# Altium PCB PCB1.PcbDoc
Units mm, origin at the board's own origin, x right, y up, seen from the top; angles counter-clockwise.
Board outline 89 x 51 mm, 4 copper layers (Top Layer 1, GND, Main Power, Small Signal), stack 0.603 mm thick; 88 components, 55 nets, 271 pads, 336 vias.
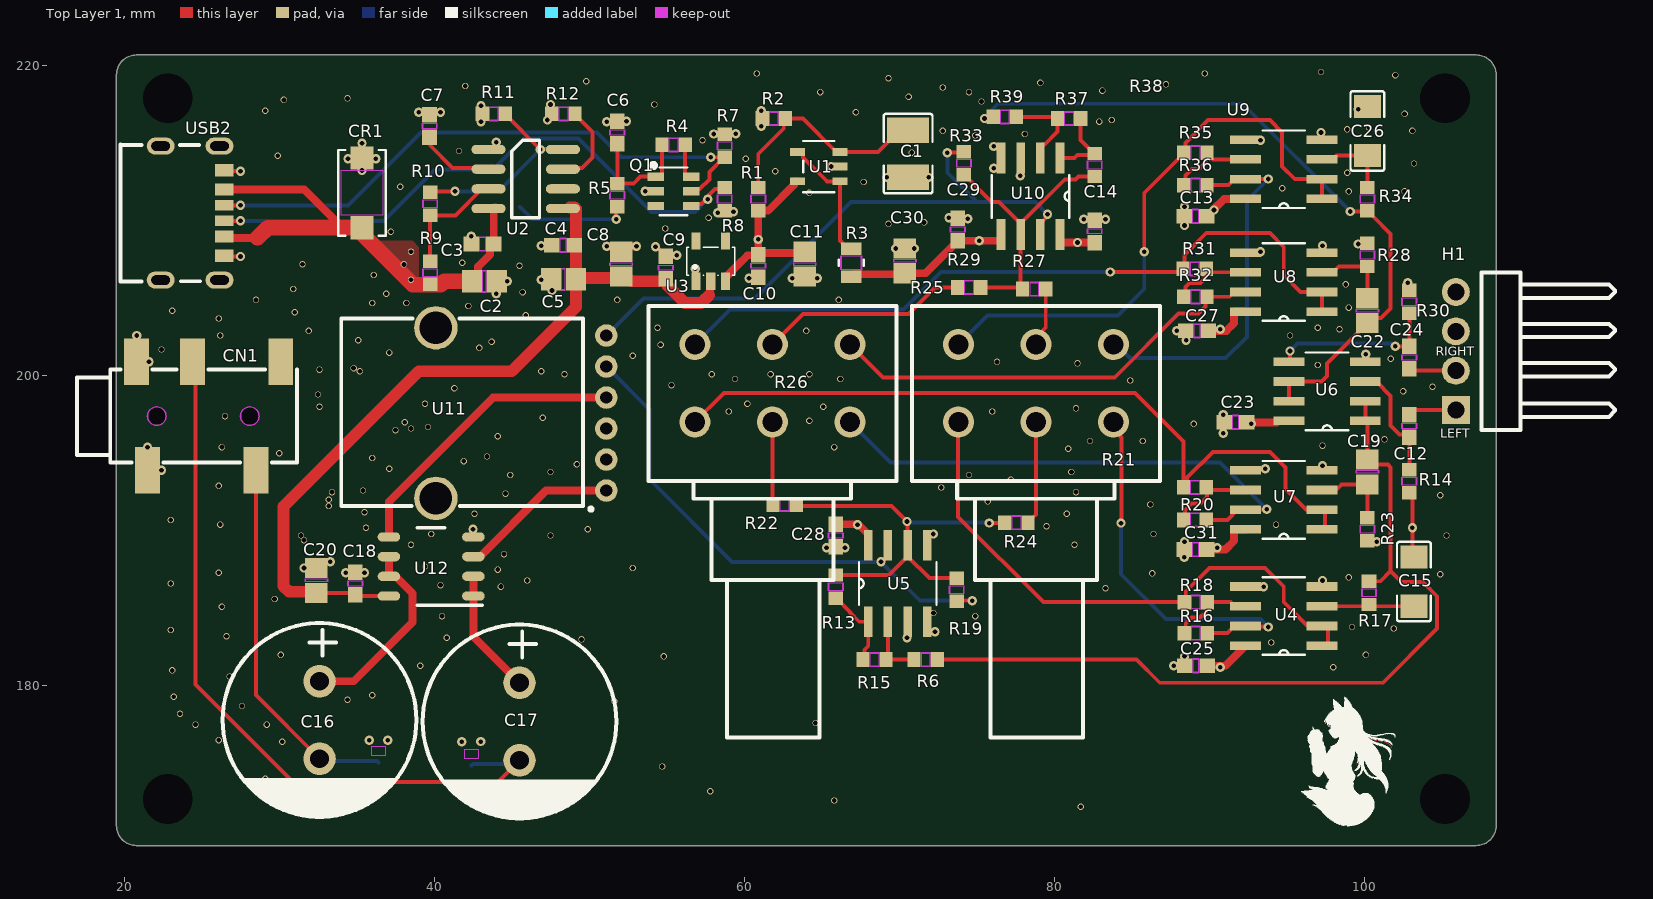
[diagram p0: Top Layer 1 view]
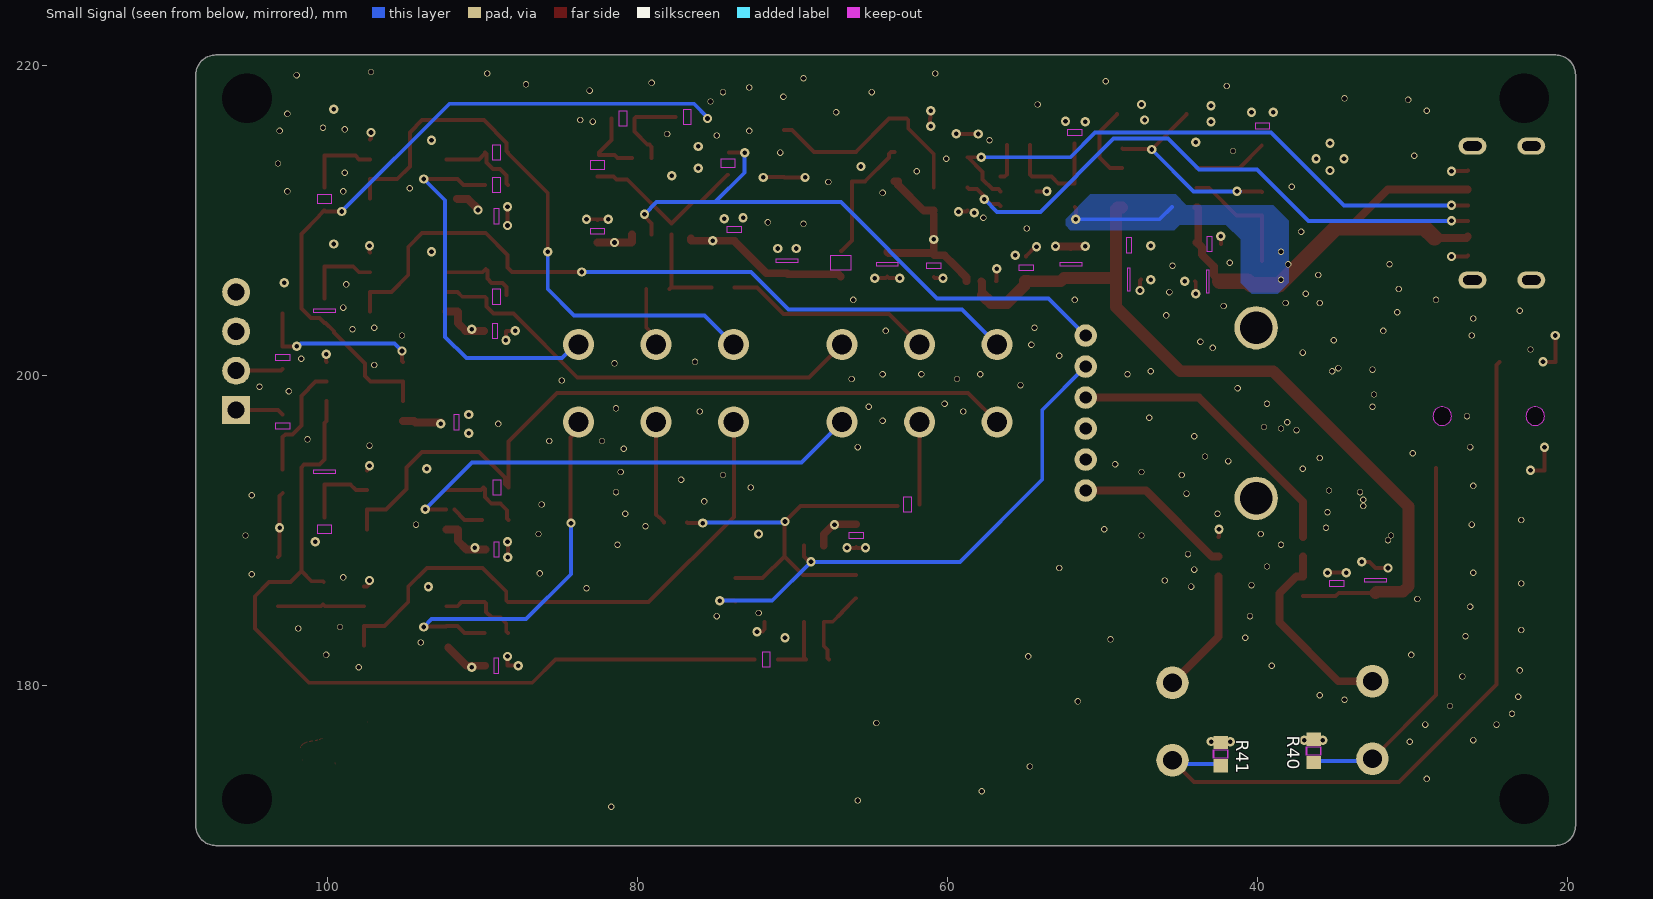
[diagram p1: Small Signal view, seen from below]
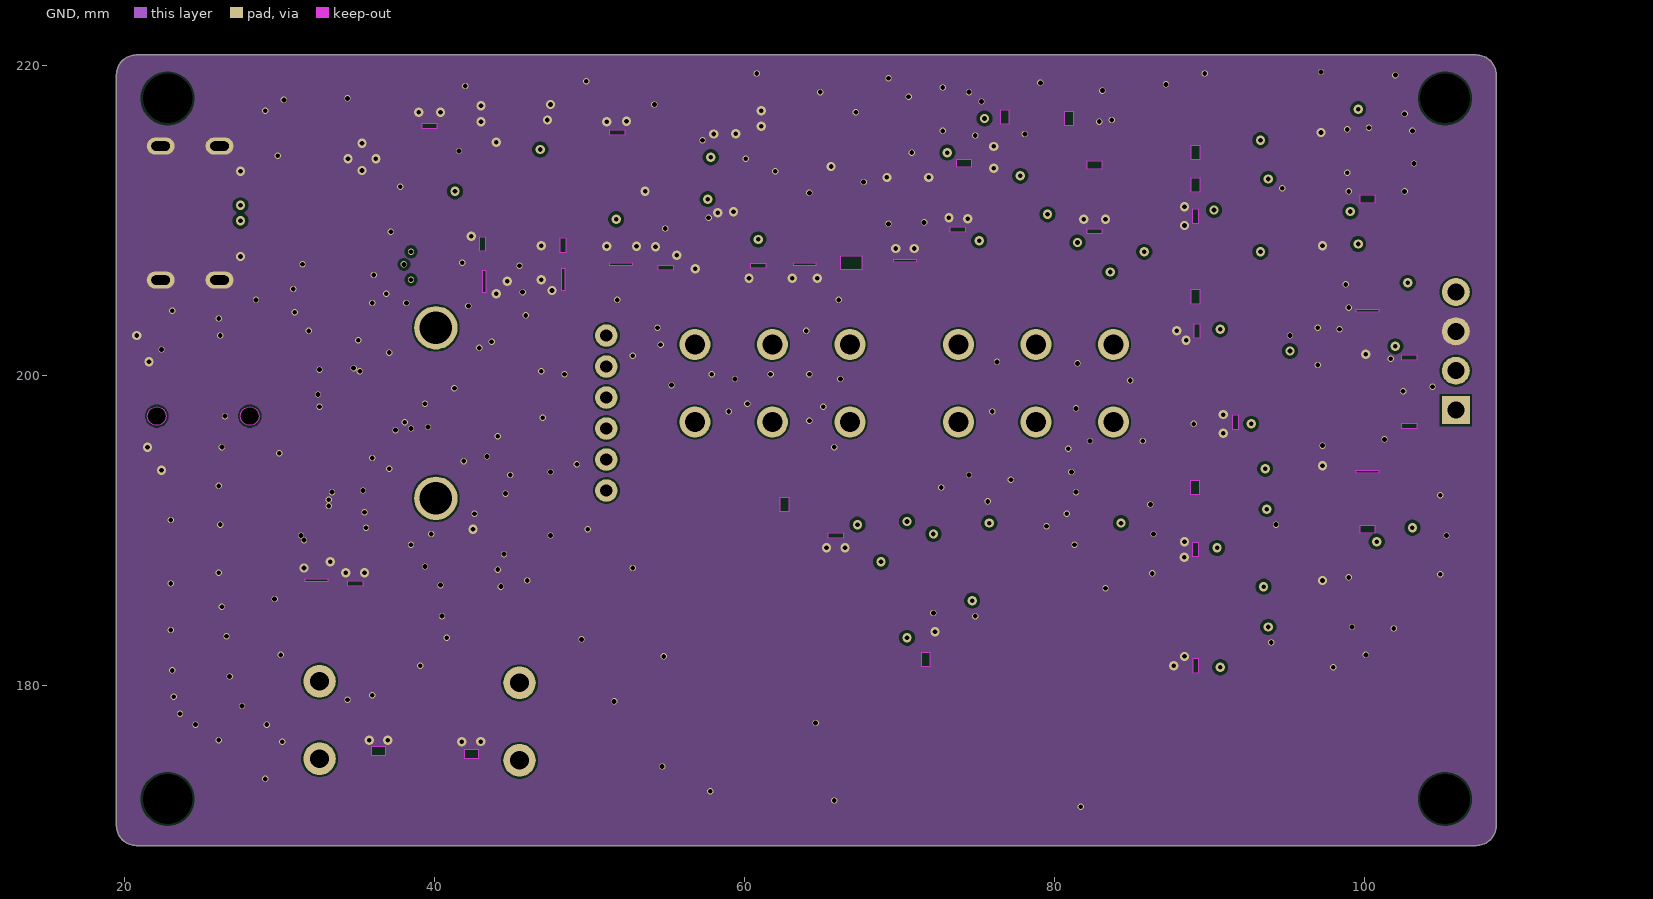
[diagram p2: GND]
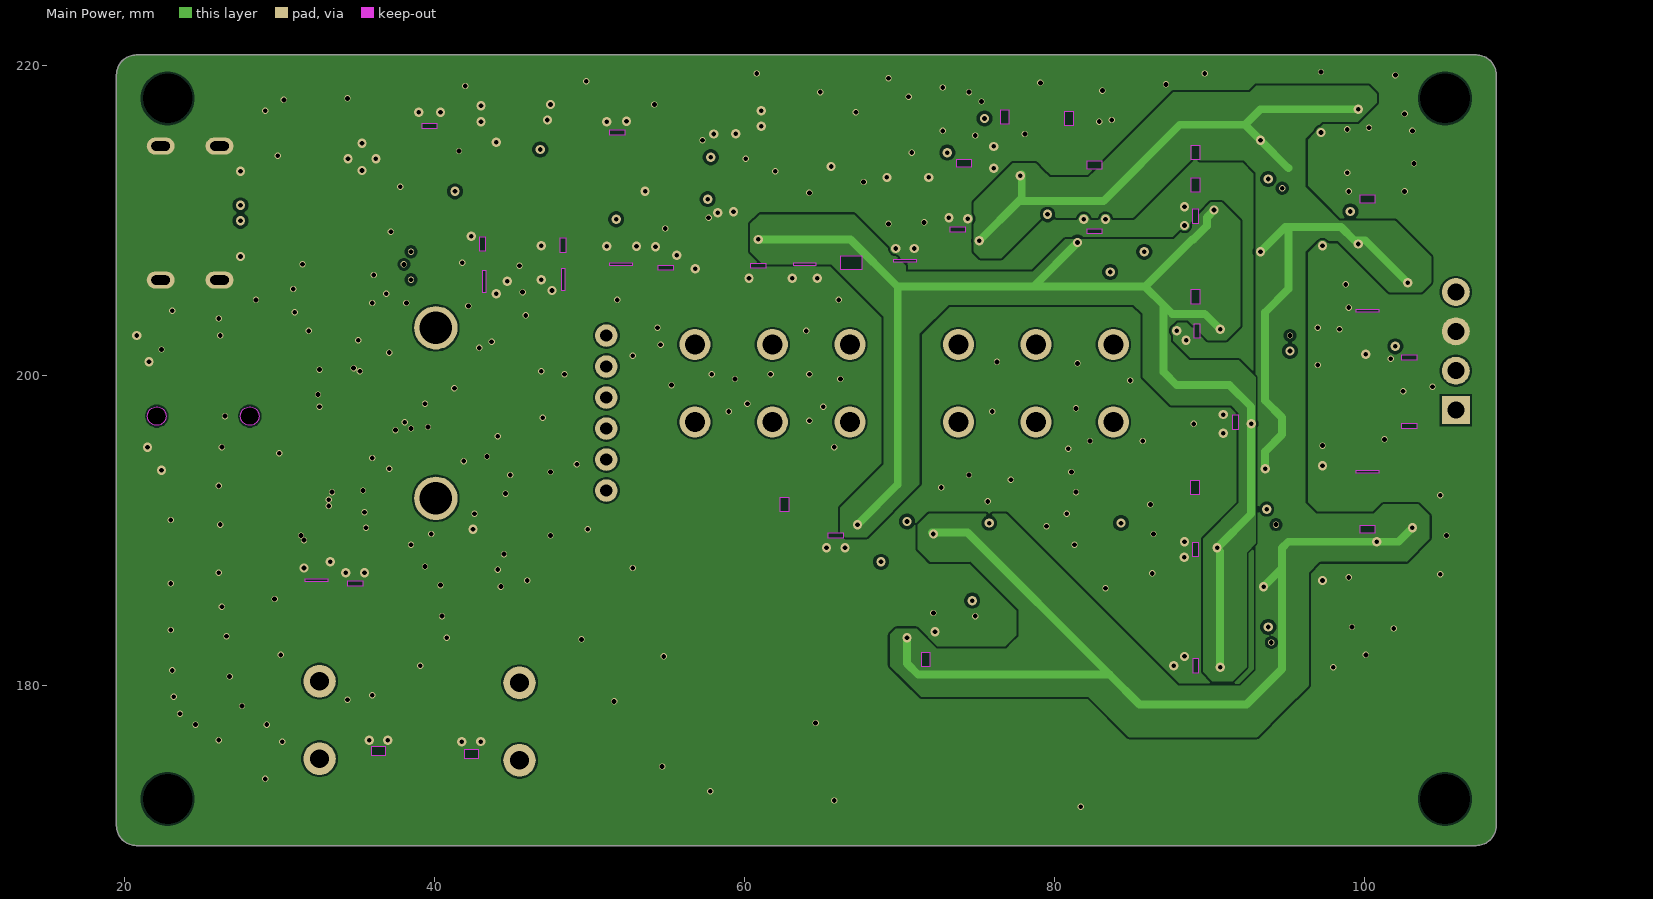
[diagram p3: Main Power]
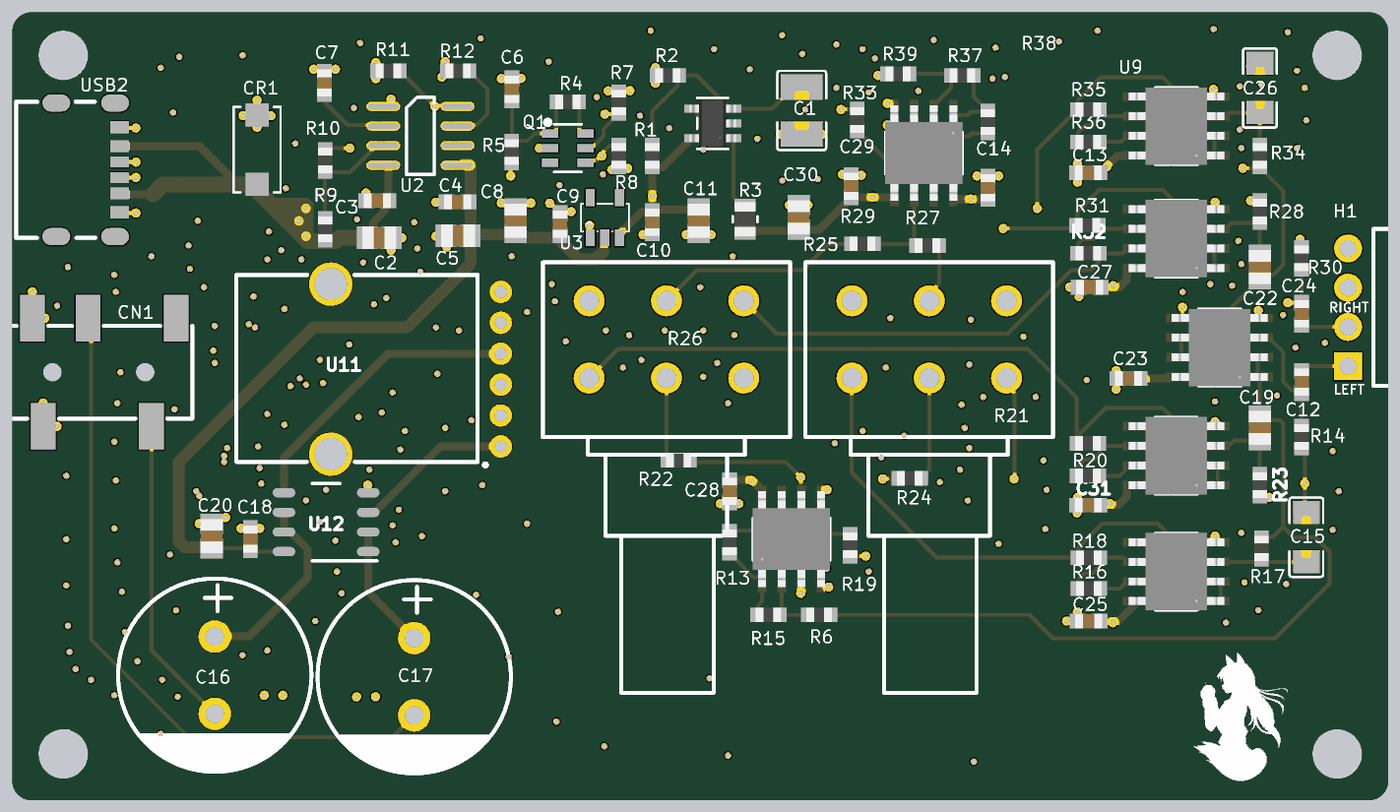
[diagram p4: 3D render of the assembled board from above, using the file's embedded part models]

## Layer stack, top to bottom
Top Solder: solder mask 0.0102, Solder Resist, Dk 3.5
Top Layer 1: signal copper 0.035
Dielectric 2: prepreg 0.0711, PP-006, Dk 4.1
GND: signal copper 0.0356
Dielectric 1: dielectric 0.32, FR-4, Dk 4.8
Main Power: signal copper 0.0356
Dielectric 3: prepreg 0.0711, PP-006, Dk 4.1
Small Signal: signal copper 0.035
Bottom Solder: solder mask 0.0102, Solder Resist, Dk 3.5

## Board outline
19.5,170.97 19.5,219.43 cw(c20.77,219.43) 20.77,220.7 107.23,220.7 cw(c107.23,219.43) 108.5,219.43 108.5,170.97 cw(c107.23,170.97) 107.23,169.7 20.77,169.7 cw(c20.77,170.97)

## Design rules (kind name [scope] priority, off if disabled: settings)
Clearance Clearance_Keepout [IsKeepOut] p1: gap=0 ignorepadtopadclearanceinfootprint=FALSE
Clearance [All] p2: gap=0.127 ignorepadtopadclearanceinfootprint=FALSE except(0.203: Arc-Via Track-Via SMDPad-Via THPad-Via Via-Via Via-Fill Via-Poly Via-Region Via-Text Via-Hole)
ComponentClearance [All] p1: gap=-1 collisioncheckmode=3 verticalgap=-1 showdistances=FALSE
HoleToHoleClearance [All] p1: gap=-1 allowstackedmicrovias=TRUE
MinimumSolderMaskSliver [All] p1: minsoldermaskwidth=-1
PlaneConnect [All] p1: planeconnectstyle=Direct reliefexpansion=0.508 reliefentries=4 reliefconductorwidth=0.254 reliefairgap=0.254
PolygonConnect [All] p1: connectstyle=Direct reliefconductorwidth=0.254 reliefentries=4 polygonreliefangle="90 Angle" airgapwidth=0.254
RoutingVias [All] p1: holewidth=0.3 width=0.6 viastyle="Through Hole" minholewidth=0.2 minwidth=0.5 maxholewidth=0.4 maxwidth=0.8
SilkToSilkClearance [All] p1: silktosilkclearance=-1
SilkToSolderMaskClearance [IsPad] p1: minsilkscreentomaskgap=-1 clearancetoexposedcopper=TRUE
SolderMaskExpansion [All] p1: expansion=0.102 istentingtop=FALSE
SupplyNets "Schematic Supply Nets_5" [InNet('Vref')] p1: voltage=0.000
SupplyNets "Schematic Supply Nets_3" [InNet('+15V_PROTECTED')] p2: voltage=0.000
SupplyNets "Schematic Supply Nets_2" [InNet('+12V')] p3: voltage=0.000
SupplyNets "Schematic Supply Nets_1" [InNet('GND')] p4: voltage=0.000
Width [All] p1: maxlimit=1816.048 minlimit=0.102 preferedwidth=0.254 toplayer_maxwidth=1816.048 midlayer1_minwidth=0.102 midlayer2_minwidth=0.102 bottomlayer_minwidth=0.102 minimp=50.000000 maximp=50.000000 favimp=50.000000
24 further rules are at their usual default settings.

## Classes and differential pairs
component class U_OUTPUT: C18 C20 U11 U12
component class U_Vref: C1 C29 C30 R1 R2 R3 U1
component class U_Power: C2 C3 C4 C5 C6 C7 C8 C9 C10 C11 CR1 Q1 R4 R5 R7 R8 R9 R10 R11 R12 U2 U3 USB2
component class U_BASSTreble: C12 C13 C14 C15 C19 C22 C23 C24 C25 C26 C27 C28 C31 R6 R13 R14 R15 R16 R17 R18 R19 R20 R21 R22 R23 R24 R25 R26 R27 R28 R29 R30 R31 R32 R33 R34 R35 R36 R37 R38 R39 U4 U5 U6 U7 U8 U9 U10
component class TOP: C16 C17 CN1 H1 R40 R41

## Components (designator, comment, footprint, x,y, rotation, side; value= is the part's Value field where it differs from the comment)
C1 "rk12l12c0a0e" "1210 CAP" 70.564,214.335 r90 top
C2 "rk12l12c0a0e" "0805 CAP - C0G" 43.236,206.1 r0 top
C3 "rk12l12c0a0e" "0603 Cap - C0G" 43.111,208.5 r180 top
C4 "rk12l12c0a0e" "0603 Cap - C0G" 48.31,208.424 r180 top
C5 "rk12l12c0a0e" "0805 CAP - C0G" 48.335,206.224 r180 top
C6 "rk12l12c0a0e" "0603 Cap - C0G" 51.811,215.7 r270 top
C7 "rk12l12c0a0e" "0603 Cap - C0G" 39.7,216.125 r270 top
C8 "rk12l12c0a0e" "0805 CAP - C0G" 52.061,207.2 r270 top
C9 "rk12l12c0a0e" "0603 Cap - C0G" 54.936,206.975 r270 top
C10 "rk12l12c0a0e" "0603 Cap - C0G" 60.9,207.1 r90 top
C11 "rk12l12c0a0e" "0805 CAP - C0G" 63.9,207.2 r90 top
C12 "rk12l12c0a0e" "0603 Cap - C0G" 102.9,196.774 r270 top
C13 "rk12l12c0a0e" "0603 Cap - C0G" 89.1,210.3 r180 top
C14 "rk12l12c0a0e" "0603 Cap - C0G" 82.6,209.325 r90 top
C15 "rk12l12c0a0e" "1206 CAP C0G" 103.2,186.728 r270 top
C16 "rk12l12c0a0e" "ELC CAP D=5" 32.6,177.8 r270 top value=2200uF
C17 "rk12l12c0a0e" "ELC CAP D=5" 45.5,177.7 r270 top value=2200uF
C18 "rk12l12c0a0e" "0603 Cap - C0G" 34.9,186.6 r270 top
C19 "rk12l12c0a0e" "0805 CAP - C0G" 100.2,193.8 r270 top
C20 "rk12l12c0a0e" "0805 CAP - C0G" 32.4,186.8 r270 top
C22 "rk12l12c0a0e" "0805 CAP - C0G" 100.2,204.2 r90 top
C23 "rk12l12c0a0e" "0603 Cap - C0G" 91.7,197 r180 top
C24 "rk12l12c0a0e" "0603 Cap - C0G" 102.9,201.174 r90 top
C25 "rk12l12c0a0e" "0603 Cap - C0G" 89.126,181.3 r0 top
C26 "rk12l12c0a0e" "1206 CAP C0G" 100.2,215.793 r90 top
C27 "rk12l12c0a0e" "0603 Cap - C0G" 89.2,202.9 r0 top
C28 "rk12l12c0a0e" "0603 Cap - C0G" 65.9,189.7 r90 top
C29 "rk12l12c0a0e" "0603 Cap - C0G" 73.764,209.443 r90 top
C30 "rk12l12c0a0e" "0805 CAP - C0G" 70.364,207.418 r270 top
C31 "rk12l12c0a0e" "0603 Cap - C0G" 89.1,188.8 r180 top
CN1 "rk12l12c0a0e" "3.5mm 5pin SMD" 25.45,197.4 r0 top
CR1 "rk12l12c0a0e" "TVS diode" 35.336,211.8 r90 top
H1 "rk12l12c0a0e" "4pin connector" 105.9,201.6 r90 top
Q1 "rk12l12c0a0e" CH221K 55.436,211.9 r270 top
R1 "rk12l12c0a0e" "0603 RES"#1 60.9,211.4 r90 top
R2 "rk12l12c0a0e" "0603 RES"#1 61.9,216.6 r180 top
R3 "rk12l12c0a0e" "0805 RES" 66.9,207.3 r90 top
R4 "rk12l12c0a0e" "0603 RES"#1 55.436,214.9 r180 top
R5 "rk12l12c0a0e" "0603 RES"#1 51.806,211.646 r90 top
R6 "rk12l12c0a0e" "0603 RES"#2 71.7,181.7 r0 top
R7 "rk12l12c0a0e" "0603 RES"#1 58.736,214.846 r270 top
R8 "rk12l12c0a0e" "0603 RES"#1 58.736,211.4 r90 top
R9 "rk12l12c0a0e" "0603 RES"#1 39.736,206.646 r90 top
R10 "rk12l12c0a0e" "0603 RES"#1 39.736,211.098 r90 top
R11 "rk12l12c0a0e" "0603 RES"#1 43.836,216.9 r180 top
R12 "rk12l12c0a0e" "0603 RES"#1 48.336,216.9 r180 top
R13 "rk12l12c0a0e" "0603 RES"#1 65.9,186.4 r270 top
R14 "rk12l12c0a0e" "0603 RES"#1 102.895,193.2 r90 top
R15 "rk12l12c0a0e" "0603 RES"#1 68.4,181.7 r180 top
R16 "rk12l12c0a0e" "0603 RES"#1 89.126,183.4 r180 top
R17 "rk12l12c0a0e" "0603 RES"#1 100.3,186 r270 top
R18 "rk12l12c0a0e" "0603 RES"#1 89.126,185.4 r180 top
R19 "rk12l12c0a0e" "0603 RES"#1 73.7,186.2 r90 top
R20 "rk12l12c0a0e" "0603 RES"#1 89.074,190.7 r180 top
R21 "rk12l12c0a0e" "0603 RES"#2 89.074,192.8 r180 top
R22 "rk12l12c0a0e" "0603 RES"#2 62.6,191.7 r0 top
R23 "rk12l12c0a0e" "0603 RES"#2 100.2,190.1 r90 top
R24 "rk12l12c0a0e" "0603 RES"#1 77.553,190.535 r180 top
R25 "rk12l12c0a0e" "Potentiometers 10K RK16312101A2" 78.5,198.8 r270 top value=10kΩ
R26 "rk12l12c0a0e" "Potentiometers 10K RK16312101A2" 61.5,198.8 r270 top value=10kΩ
R27 "rk12l12c0a0e" "0603 RES"#1 78.7,205.6 r180 top
R28 "rk12l12c0a0e" "0603 RES"#1 100.2,207.8 r270 top
R29 "rk12l12c0a0e" "0603 RES"#1 74.5,205.7 r0 top
R30 "rk12l12c0a0e" "0603 RES"#1 102.895,204.774 r270 top
R31 "rk12l12c0a0e" "0603 RES"#1 89.053,206.9 r180 top
R32 "rk12l12c0a0e" "0603 RES"#2 89.1,205.1 r180 top
R33 "rk12l12c0a0e" "0603 RES"#2 74.164,213.718 r270 top
R34 "rk12l12c0a0e" "0603 RES"#2 100.2,211.4 r90 top
R35 "rk12l12c0a0e" "0603 RES"#2 89.1,214.4 r180 top
R36 "rk12l12c0a0e" "0603 RES"#2 89.1,212.3 r180 top
R37 "rk12l12c0a0e" "0603 RES"#2 80.954,216.6 r0 top
R38 "rk12l12c0a0e" "0603 RES"#2 82.6,213.6 r90 top
R39 "rk12l12c0a0e" "0603 RES"#2 76.8,216.7 r180 top
R40 "rk12l12c0a0e" "0603 RES"#2 36.4,175.8 r270 bottom
R41 "rk12l12c0a0e" "0603 RES"#2 42.4,175.6 r90 bottom
U1 "rk12l12c0a0e" OPA197IDBVR 64.8,213.5 r180 top
U2 "rk12l12c0a0e" "TPS25921ADR e-fuse" 45.9,212.695 r0 top
U3 "rk12l12c0a0e" LDO 57.836,207.4 r270 top
U4 "rk12l12c0a0e" OPA1612AIDR 94.8,184.5 r180 top
U5 "rk12l12c0a0e" OPA1612AIDR 69.9,186.6 r90 top
U6 "rk12l12c0a0e" OPA1612AIDR 97.6,199 r180 top
U7 "rk12l12c0a0e" OPA1612AIDR 94.8,192 r180 top
U8 "rk12l12c0a0e" OPA1612AIDR 94.8,206.045 r180 top
U9 "rk12l12c0a0e" OPA1612AIDR 94.8,213.326 r180 top
U10 "rk12l12c0a0e" OPA1612AIDR 78.464,211.581 r270 top
U11 "rk12l12c0a0e" "LOG Potentiometer" 45.6,197.6 r90 top value=10kΩ
U12 "rk12l12c0a0e" OPA1656IDR 39.8,187.7 r180 top
USB2 "rk12l12c0a0e" USB-C-SMD_10P-P1.00-L6.8-W8.9 24.4,210.5 r270 top

## Footprints (in the part's own frame and the unit in brackets; to place one, negate y for a bottom-side part, rotate by r counter-clockwise, add the part's x,y. Pads: shape width x height; smd on the part's side, far side on the other; paste and mask are expansions set on the pad)
"3.5mm 5pin SMD" [mm]
  rect 1.6x3 smd: 2(-4.65,3.5) 3(4.65,3.5) 4(3.05,-3.5) 5(-3.95,-3.5) 6(-1.05,3.5)
  Top Layer 1 keep-out circle w0.003: c2.65,0 r0.6
  Top Layer 1 keep-out circle w0.003: c-3.35,0 r0.6
  Top Layer 1 keep-out region: 3.25,0 3.191,-0.26 3.024,-0.469 2.783,-0.585 2.516,-0.585 2.276,-0.469 2.109,-0.26 2.05,0 2.05,0 2.109,0.26 2.276,0.469 2.516,0.585 2.783,0.585 3.024,0.469 3.191,0.26 3.25,0
  Top Layer 1 keep-out region: -2.75,0 -2.809,-0.26 -2.976,-0.469 -3.216,-0.585 -3.484,-0.585 -3.724,-0.469 -3.891,-0.26 -3.95,0 -3.95,0 -3.891,0.26 -3.724,0.469 -3.484,0.585 -3.216,0.585 -2.976,0.469 -2.809,0.26 -2.75,0
  Top Layer 1 keep-out region: 3.25,0 3.241,-0.104 3.214,-0.205 3.17,-0.3 3.11,-0.386 3.036,-0.46 2.95,-0.52 2.855,-0.564 2.754,-0.591 2.65,-0.6 2.546,-0.591 2.445,-0.564 2.35,-0.52 2.264,-0.46 2.19,-0.386 2.13,-0.3 2.086,-0.205 2.059,-0.104 2.05,0 2.059,0.104 2.086,0.205 2.13,0.3 2.19,0.386 2.264,0.46 2.35,0.52 2.445,0.564 2.546,0.591 2.65,0.6 2.754,0.591 2.855,0.564 2.95,0.52 3.036,0.46 3.11,0.386 3.17,0.3 3.214,0.205 3.241,0.104 3.25,0
  Top Layer 1 keep-out region: -2.75,0 -2.759,-0.104 -2.786,-0.205 -2.83,-0.3 -2.89,-0.386 -2.964,-0.46 -3.05,-0.52 -3.145,-0.564 -3.246,-0.591 -3.35,-0.6 -3.454,-0.591 -3.555,-0.564 -3.65,-0.52 -3.736,-0.46 -3.81,-0.386 -3.87,-0.3 -3.914,-0.205 -3.941,-0.104 -3.95,0 -3.941,0.104 -3.914,0.205 -3.87,0.3 -3.81,0.386 -3.736,0.46 -3.65,0.52 -3.555,0.564 -3.454,0.591 -3.35,0.6 -3.246,0.591 -3.145,0.564 -3.05,0.52 -2.964,0.46 -2.89,0.386 -2.83,0.3 -2.786,0.205 -2.759,0.104 -2.75,0
  Keep-Out Layer board cut-out: 3.25,0 3.191,-0.26 3.024,-0.469 2.783,-0.585 2.516,-0.585 2.276,-0.469 2.109,-0.26 2.05,0 2.05,0 2.109,0.26 2.276,0.469 2.516,0.585 2.783,0.585 3.024,0.469 3.191,0.26 3.25,0
  Keep-Out Layer board cut-out: -2.75,0 -2.809,-0.26 -2.976,-0.469 -3.216,-0.585 -3.484,-0.585 -3.724,-0.469 -3.891,-0.26 -3.95,0 -3.95,0 -3.891,0.26 -3.724,0.469 -3.484,0.585 -3.216,0.585 -2.976,0.469 -2.809,0.26 -2.75,0
  silkscreen extent -8.5,-3 5.7,3
"4pin connector" [mm]
  rect 1.8x1.8 hole 1.1: 1(-3.81,0)
  round 1.8 hole 1.1: 2(-1.27,0) 3(1.27,0) 4(3.81,0)
  silkscreen extent -5.09,-10.27 5.07,-1.65
"0603 Cap - C0G" [mm]
  rect 1x0.95 smd paste+0 mask+0: 1(-0.725,0) 2(0.725,0)
  Top Layer 1 keep-out region: -0.174,-0.424 -0.174,0.424 0.174,0.424 0.174,-0.424
  Keep-Out Layer region: -0.174,-0.475 -0.174,0.475 0.174,0.475 0.174,-0.475
  body extent -0.87,-0.48 0.87,0.48, height 0.95
"0603 RES"#1 [mil]
  rect 33.78x37 smd paste+0 mask+0: 1(-29.39,0) 2(29.39,0)
  Top Layer 1 keep-out region: -10.5,-16.5 -10.5,16.5 10.5,16.5 10.5,-16.5
  Top Layer 1 keep-out region: -10.5,-18.5 -10.5,18.5 10.5,18.5 10.5,-18.5
  body extent -33,-19 33,19, height 20
"0603 RES"#2 [mil]
  rect 33.78x37 smd paste+0 mask+0: 1(-29.39,0) 2(29.39,0)
  Top Layer 1 keep-out region: -10.5,-16.5 -10.5,16.5 10.5,16.5 10.5,-16.5
  Keep-Out Layer region: -10.5,-18.5 -10.5,18.5 10.5,18.5 10.5,-18.5
  body extent -33,-19 33,19, height 20
"0805 CAP - C0G" [mm]
  rect 1.3x1.45 smd paste+0 mask+0: 1(-0.8,0) 2(0.8,0)
  Top Layer 1 keep-out region: -0.099,-0.674 -0.099,0.674 0.099,0.674 0.099,-0.674
  Keep-Out Layer region: -0.099,-0.725 -0.099,0.725 0.099,0.725 0.099,-0.725
  body extent -1.1,-0.72 1.1,0.72, height 0.88
"0805 RES" [mil]
  rect 32x53 smd paste+0 mask+0: 1(-35.5,0) 2(35.5,0)
  Top Layer 1 keep-out region: -17.5,-24.5 -17.5,24.5 17.5,24.5 17.5,-24.5
  Keep-Out Layer region: -17.5,-26.5 -17.5,26.5 17.5,26.5 17.5,-26.5
  silkscreen extent -7,-32 7,32, body extent -44,-26 44,26, height 26
"1206 CAP C0G" [mm]
  rect 1.485x1.728 smd paste-100 mask+0.051: 1(-1.593,0) 2(1.593,0)
  silkscreen extent -2.56,-1.09 2.56,1.09
"1210 CAP" [mm]
  rect 1.635x2.7 smd paste-100 mask+0.051: 1(-1.517,0) 2(1.517,0)
  silkscreen extent -2.56,-1.58 2.56,1.58
CH221K [mm] "SOT-23-6_L2.9-W1.6-P0.95-LS2.8-BL-2"
  rect 0.532x1.072 smd: 1(-0.95,-1.149) 2(0,-1.149) 3(0.95,-1.149) 4(0.95,1.149) 5(0,1.149) 6(-0.95,1.149)
  silkscreen extent -1.82,-1.45 1.54,0.89
"ELC CAP D=5" [mm]
  round 2.1 hole 1.2 paste-2539.97 mask+0.05: 1(-2.5,0) 2(2.5,0)
  silkscreen extent -6.25,-6.25 6.25,6.25
LDO [mm]
  rect 1.1x0.6 smd: 1(1.3,-0.95) 2(1.3,0) 3(1.3,0.95) 4(-1.3,0.95) 5(-1.3,-0.95)
  silkscreen extent -0.9,-1.55 0.9,1.55
"LOG Potentiometer" [mm]
  round 1.45 hole 0.8 paste-2539.97 mask+0.05: 1(-5,-5.5) 2(-3,-5.5) 3(-1,-5.5) 4(1,-5.5) 5(3,-5.5) 6(5,-5.5)
  round 2.8 hole 2.1 paste-2539.97 mask+0.05: 7(-5.5,5.5) 8(5.5,5.5)
  silkscreen extent -6.3,-4.6 6.1,11.6
OPA197IDBVR [mil]
  rect 38.28x20 smd paste+0 mask+0: 1(-53.64,37.4) 2(-53.64,0) 3(-53.64,-37.4) 4(53.64,-37.4) 5(53.64,37.4)
  silkscreen extent -40,-65 40,65, body extent -59,-60 59,60, height 57
OPA1612AIDR [mil]
  rect 78x22 smd paste-39 mask-39: 1(-97,75) 2(-97,25) 3(-97,-25) 4(-97,-75) 5(97,-75) 6(97,-25) 7(97,25) 8(97,75)
  silkscreen extent -54,-98 54,98, body extent -122,-99 122,99, height 69
OPA1656IDR [mm]
  oval 1.45x0.6 smd paste+0 mask+0: 1(-2.725,1.905) 2(-2.725,0.635) 3(-2.725,-0.635) 4(-2.725,-1.905) 5(2.725,-1.905) 6(2.725,-0.635) 7(2.725,0.635) 8(2.725,1.905)
  silkscreen extent -3.3,-2.5 0.9,2.5
"Potentiometers 10K RK16312101A2" [mm] "10K"
  round 2 hole 1.3: 1(1.778,-4.686) 2(1.778,0.314) 3(1.778,5.314) 4(-3.222,-4.686) 5(-3.222,0.314) 6(-3.222,5.314)
  silkscreen extent -5.72,-7.69 22.14,8.32
"TPS25921ADR e-fuse" [mm]
  oval 2.2x0.6 smd paste-0.102 mask+0.051: 1(-2.4,1.905) 2(-2.4,0.635) 3(-2.4,-0.635) 4(-2.4,-1.905) 5(2.4,-1.905) 6(2.4,-0.635) 7(2.4,0.635) 8(2.4,1.905)
  silkscreen extent -0.9,-2.5 0.9,2.5
"TVS diode" [mil]
  rect 59x59 smd paste+0 mask+0: 1(-88.5,0) 2(88.5,0)
  Top Layer 1 keep-out region: -57,-53 -57,53 57,53 57,-53
  Top Layer 1 keep-out region: -57,-53 -57,53 57,53 57,-53
  silkscreen extent -109,-60 109,60
USB-C-SMD_10P-P1.00-L6.8-W8.9 [mm]
  oval 1.1x1.8 hole 0.6 slot 1.2 at 90 deg: 0(-4.32,1.75) 0(-4.32,-2.05) 0(4.32,1.75) 0(4.32,-2.05)
  rect 0.8x1.2 smd paste-100 mask+0.051: 1(-2.75,2.05) 6(2.75,2.05)
  rect 0.76x1.2 smd paste-100 mask+0.051: 2(-1.52,2.05) 5(1.52,2.05)
  rect 0.7x1.2 smd paste-100 mask+0.051: 3(-0.5,2.05) 4(0.5,2.05)
  silkscreen extent -4.41,-4.65 4.41,0.49

## Part data
C1 C2 C3 C4 C5 C6 C7 C8 C9 C10 C11 C12 C13 C14 C15 C18 C19 C20 C22 C23 C24 C25 C26 C27 C28 C29 C30 C31: library part CAP_CERAMIC, Manufacturer_Name=Kemet, Manufacturer_Part_Number=C0603C104K5RACTU, Copyright="Copyright (C) 2026 Ultra Librarian. All rights reserved."
C16 C17: library part CAP_ELECTROLYTIC, "Tolerance:±20% Voltage Rating:25V Pin Spacing:5mm Diameter:12.5mm Height - Seated (Max):25mm Lifetime:2000hrs@105℃ Operating Temperature:-40℃~+105℃ Operating Temperature:-40℃~+105℃ Polarity type:Polarized", JLCPCB Part Class="Extended Part", LCSC Part Name="2200uF ±20% 25V", Manufacturer=Jianghai(南通江海), ManufacturerPart=ECR1EBK222MLL125025, Operating Temperature=-40℃~+105℃, Tolerance=±20%, Voltage Rating=25V, AddInBom=yes, ConvertToPcb=yes, Datasheet=https://item.szlcsc.com/datasheet/ECR1EBK222MLL125025/232937.html, Diameter=12.5mm, FootprintName=CAP-TH_BD12.5-P5.00-D0.6-FD, Height - Seated (Max)=25mm, Lifetime=2000hrs@105℃, ModelId=bba5f7414a9d4a73a222d32de1544099, ModelName=CAP-TH_D12.5-H20.0-P5.00, ModelTransform=492.5187,492.11201,0,0,0,0,0,0,-137.795, Pin Spacing=5mm, Polarity type=Polarized, Supplier=LCSC, Supplier Footprint=插件, SupplierPart=C233102, Symbol=ECR1EBK222MLL125025
CN1: library part "3.5mm 5pin SMD", "Connector Type:3.5mm Headphone Jack Current Rating:500mA Voltage Rating (Max):30V Contact Material:Copper Contact Plating:Silver Operating Temperature:-25℃~+85℃ Operating Temperature:-25℃~+85℃ Rank Number:TRRS Mounting Style:Surface Mount Color:Black Body", Color=Black, Current Rating=500mA, JLCPCB Part Class="Extended Part", LCSC Part Name=3.5mm耳机座, Manufacturer=XUNPU(讯普), ManufacturerPart=PJ-327A, Operating Temperature=-25℃~+85℃, Voltage Rating (Max)=30V, AddInBom=yes, Body Height=4.4mm, Connector Type="3.5mm Headphone Jack", Contact Material=Copper, Contact Plating=Silver, ConvertToPcb=yes, Datasheet=https://item.szlcsc.com/datasheet/PJ-327A/51736272.html, FootprintName=AUDIO-SMD_XUNPU_PJ-327A, Length=14.2mm, ModelId=28a3bb7a9e024b9f97707116e53a84e6, ModelName=AUDIO-SMD_XUNPU_PJ-327A, ModelTransform=559.054,338.55094,0,0,0,0,-55.118,0,-25.591, Mounting Style="Surface Mount", Rank Number=TRRS, Supplier=LCSC, Supplier Footprint=SMD, SupplierPart=C49284723, Symbol=PJ-327A, Width=6mm
CR1: library part "SMAJ18A TVS", "Description", Manufacturer_Name="Bourns Electronics", Manufacturer_Part_Number=SMAJ18A, Copyright="Copyright (C) 2026 Ultra Librarian. All rights reserved."
H1: library part "4pin connector", "Pin Structure:1x4P Pitch:2.54mm Row Spacing:- Circluar Pins/Square Pins:Pin Header Mounting Type:Right Angle Number of Rows:1 Number of Pins:4P Current Rating:3A Voltage Rating (Max):250V Length of Mating Pin:6mm Insulation Height:2.5mm Length of End Conn", Color=Black, Current Rating=3A, JLCPCB Part Class="Extended Part", LCSC Part Name="1x4P 间距:2.54mm 方针 弯插", Manufacturer=XFCN(兴飞), ManufacturerPart=PZ254R-11-04P, Operating Temperature=-40℃~+105℃, Voltage Rating (Max)=250V, AddInBom=yes, Circluar Pins/Square Pins="Pin Header", Contact Material=Brass, Contact Plating=-, ConvertToPcb=yes, Datasheet=https://item.szlcsc.com/datasheet/PZ254R-11-04P/502968.html, FootprintName=HDR-TH_4P-P2.54-H-M-W10.4, Insulation Height=2.5mm, Length of End Connection Pin=-, Length of Mating Pin=6mm, ModelId=13284729e4054d7b9656609df5ff9409, ModelName=HDR-TH_4P-P2.54-M-WI-1X4P, ModelTransform=399.999,417.322,0,180,0,0,0,-196.85,-118.11, Mounting Type="Right Angle", Number of Pins=4P, Number of Rows=1, Pin Structure=1x4P, Pitch=2.54mm, Row Spacing=-, Supplier=LCSC, Supplier Footprint=弯插,P=2.54mm, SupplierPart=C492412, Symbol=PZ254R-11-04P
Q1: library part CH221K, "100W PD3.2 / 100K请求15V", JLCPCB Part Class="Extended Part", LCSC Part Name=USBPD多快充协议受电芯片, Manufacturer=WCH(南京沁恒), Operating Temperature=-40℃~+105℃, Output Power=100W, Output Voltage=5V；20V；15V；12V；9V, Voltage - Supply=-, AddInBom=yes, ConvertToPcb=yes, Datasheet=https://item.szlcsc.com/datasheet/CH221K/5724821.html, FootprintName=SOT-23-6_L2.9-W1.6-P0.95-LS2.8-BL-2, ManufacturerPart=CH221K, ModelId=838e09e61e8e47a1ac5306b7bfd21d61, ModelName=SOT-23-6_L2.9-W1.6-P0.95-LS2.8-BL-2, ModelTransform=114.173,110.236,0,0,0,0,0,0,0, Number of Channels=-, Protocol="PD 3.0", Supplier=LCSC, Supplier Footprint=SOT-23-6, SupplierPart=C5125736, Symbol=CH221K, Type="Power Receiver Controller"
R1 R2 R3 R4 R5 R6 R7 R8 R9 R10 R11 R12 R13 R14 R15 R16 R17 R18 R19 R20 R21 R22 R23 R24 R27 R28 R29 R30 R31 R32 R33 R34 R35 R36 R37 R38 R39 R40 R41: library part Resistor, Manufacturer_Name=Vishay, Manufacturer_Part_Number=CRCW060310K0FKEA, Copyright="Copyright (C) 2025 Ultra Librarian. All rights reserved."
R25 R26: library part "Potentiometers 10K RK16312101A2", "Resistance: 10K Tolerance:±20% Tolerance:±20% Rated Voltage:- Power(Watts):- Turns:", JLCPCB Part Class="Extended Part", LCSC Part Name="10kΩ ±20% 三件套", Manufacturer=ALPSALPINE(阿尔卑斯阿尔派), ManufacturerPart=RK16312101A2, Power(Watts)=-, Tolerance=±20%, AddInBom=yes, ConvertToPcb=yes, Datasheet=https://atta.szlcsc.com/upload/public/pdf/source/20191216/C470593_7E935C2EB9A734DEAF0A292D32EDD773.pdf, FootprintName=RES-ADJ-TH_RK16312A0BKR, ModelId=92b7132f4c3c4015aff86e677bf882d2, ModelName=RES-ADJ-TH_RK16312A0BKR, ModelTransform=1066.927,708.66,0,0,0,0,326.772,0,-137.795, Rated Voltage=-, Supplier=LCSC, Supplier Footprint=插件-6P, SupplierPart=C470593, Symbol=RK16312101A2
U1: library part OPA197IDBVR, "Single, 36-V, precision, rail-to-rail input output, low offset voltage op amp 5-SOT-23 -40 to 125", Manufacturer_Name="Texas Instruments", Copyright="Copyright (C) 2026 Ultra Librarian. All rights reserved.", Manufacturer_Part_Number=OPA197IDBVR, RefDes=RefDes, Type=Type
U2: library part "TPS25921ADR e-fuse", "4.5-V to 18-V, 90m惟, 0.4-1.6A eFuse with auto retry fault response 8-SOIC -40 to 85", Manufacturer="Texas Instruments", Manufacturer_Part_Number=TPS25921ADR, PartNumber=TPS25921AD, CompType=IC, Copyright="Copyright (C) 2026 Ultra Librarian. All rights reserved.", Manufacturer_Name="Texas Instruments", MountType=SMT, PackageReference=D0008A, RefDes=RefDes, RoHS=Y, Type=TYPE
U3: library part "ht75c0-2 LDO", "Output Configuration:Positive Voltage - Supply:30V Output Voltage:12V Output Voltage:12V Output Current:150mA Power Supply Rejection Ratio (PSRR):- Voltage Dropout:25mV@(1mA) standby current:2.5uA Operating Temperature:-40℃~+85℃ Operating Temperature:-40℃", JLCPCB Part Class="Extended Part", LCSC Part Name="12V 150mA 30V", Manufacturer=HOLTEK(合泰/盛群), ManufacturerPart=HT75C0-2, Operating Temperature=-40℃~+85℃, Output Current=150mA, Output Voltage=12V, Power Supply Rejection Ratio (PSRR)=-, standby current=2.5uA, Voltage - Supply=30V, Voltage Dropout=25mV@(1mA), AddInBom=yes, ConvertToPcb=yes, FootprintName=SOT-23-5_L3.0-W1.7-P0.95-LS2.8-BR, ModelId=3168b22659ce4998ae232d44bb704e0a, ModelName=SOT-23-5_L2.9-W1.6-H1.1-LS2.8-P0.95, ModelTransform=114.173,109.636,0,180,0,0,0,0,0, Number of Outputs=1, Output Configuration=Positive, Output Type=Fixed, Supplier=LCSC, Supplier Footprint=SOT-23-5, SupplierPart=C95005, Symbol=HT75C0-2
U4 U5 U6 U7 U8 U9 U10: library part OPA1612AIDR, "SoundPlusa?￠ Audio Operational Amplifier with 1.1nV/a??Hz Noise, Low THD and Precision 8-SOIC -40 to 85", Manufacturer_Name="Texas Instruments", Copyright="Copyright (C) 2025 Ultra Librarian. All rights reserved.", Manufacturer_Part_Number=OPA1612AIDR, RefDes=RefDes, Type=Type
U11: library part "LOG Potentiometer", "Resistance: Tolerance:±20% Tolerance:±20% Rated Voltage: Power(Watts):50mW Turns:-", JLCPCB Part Class="Extended Part", LCSC Part Name="10kΩ ±20%", Manufacturer=ALPSALPINE(阿尔卑斯阿尔派), ManufacturerPart=RK12L12C0A0E, Power(Watts)=50mW, Tolerance=±20%, AddInBom=yes, ConvertToPcb=yes, Datasheet=https://atta.szlcsc.com/upload/public/pdf/source/20191216/C470380_93C0132B2AE7BA8B014CE4021E4797E4.pdf, FootprintName=RES-ADJ-TH_RK12L1230C1M, ModelId=34e0376d5eee43e6a3b83596b84c8b47, ModelName=RES-ADJ-TH_RK12L1230C1M, ModelTransform=535.43082,681.101,0,0,0,0,-0.004,112.202,-145.669, Supplier=LCSC, Supplier Footprint=插件-6P,15.5x12mm, SupplierPart=C470285, Symbol=RK12L12C0A0E, Turns=-
U12: library part opa1656idr, "Number of Channels:2 Gain Bandwidth Product:53MHz Ib - Input Bias Current:20pA Vos - Input Offset Voltage:1mV Common Mode Rejection Ratio(CMRR):120dB Slew Rate:24V/us Quiescent Current(Iq):3.9mA Rail To Rail:Rail-to-rail output Input Offset Voltage Drift(", Ib - Input Bias Current=20pA, Input Offset Voltage Drift(Vos TC)=2uV/℃, JLCPCB Part Class="Extended Part", LCSC Part Name=超低噪声、低失真、FET输入音频运算放大器, Manufacturer=TI(德州仪器), ManufacturerPart=OPA1656IDR, Operating Temperature=-40℃~+125℃, Output Current=100mA, Quiescent Current(Iq)=3.9mA, Vos - Input Offset Voltage=1mV, AddInBom=yes, Common Mode Rejection Ratio(CMRR)=120dB, ConvertToPcb=yes, Datasheet=https://www.ti.com/cn/lit/ds/symlink/opa1656.pdf, Dual Supply=-18V~-2.25V；2.25V~18V, FootprintName=SOIC-8_L4.9-W3.9-P1.27-LS6.0-BL, Gain Bandwidth Product=53MHz, Input Offset Current(Ios)=20pA, ModelId=2ec1ac1bf9bf4d09a988fcee15e6a02d, ModelName=SOIC-8_L4.9-W3.9-H1.7-LS6.0-P1.27, ModelTransform=192.913,236.22,0,0,0,0,0,0,0, Noise density(eN)=4.3nV/√Hz@1kHz, Number of Channels=2, Rail To Rail="Rail-to-rail output", Single Supply=4.5V~36V, Slew Rate=24V/us, Supplier=LCSC, Supplier Footprint=SOIC-8, SupplierPart=C1849431, Symbol=OPA1656IDR
USB2: library part type-c-31-m-17, "Connector Type:Type-C Protocol Standard:- Gender:Female Mounting Type:Surface Mount, Right Angle Number of Contacts:6P Number of Ports:1 Current Rating-Power:5A Voltage Rating:20V Connect-Disconnect Life:3,000 Cycles Length:6.8mm Operating Temperature:-30", Current Rating-Power=5A, JLCPCB Part Class="Extended Part", LCSC Part Name="Type-C 母 卧贴", Manufacturer=韩国韩荣, Manufacturer Part=TYPE-C-31-M-17, Operating Temperature=-30℃~+80℃, Voltage Rating=20V, AddInBom=yes, Connect-Disconnect Life="3,000 Cycles", Connector Type=Type-C, ConvertToPcb=yes, Datasheet=https://item.szlcsc.com/datasheet/TYPE-C-31-M-17/269351.html, FootprintName=USB-C-SMD_10P-P1.00-L6.8-W8.9, Gender=Female, Length=6.8mm, ModelId=ab6076bf4dcb42b58b12fcacb7ccdaa0, ModelName=TYPE-C-SMD_6P-L8.9-W6.8-H3.2-P1.00, ModelTransform=351.9678,267.716,0,180,0,0,-0.001,-47.957,-39.37, Mounting Type="Surface Mount, Right Angle", Number of Contacts=6P, Number of Ports=1, Protocol Standard=-, Supplier=LCSC, Supplier Footprint=SMD, Supplier Part=C283540, Symbol=TYPE-C-31-M-17

## Free pads (board coordinates)
  round 0 hole 3.2 unplated: 3(22.8,172.7) 3(22.8,217.9) 3(105.2,172.7) 3(105.2,217.9)

## Via types
v1: diameter 0.41, hole 0.31, Top Layer 1 to Small Signal, 214 vias
v2: diameter 0.6, hole 0.3, Top Layer 1 to Small Signal, 122 vias

## Nets (pads, with @x,y where several pads share a name; then routed paths per layer and width w, separated by ;. In a path a pad name is that pad's centre, name@x,y a point inside that pad or via, vN(x,y) a via of type N, cw(c..) or ccw(c..) an arc to the next point about the centre after c; other vN are vias at no path point)
+12V: C10.2 C11.2 C13.1 C14.1 C23.1 C25.2 C27.2 C28.2 C31.1 R1.1 U1.5 U3.3 U4.8 U5.8 U6.8 U7.8 U8.8 U9.8 U10.8 | length 119.9
  Top Layer 1 w0.508: U3.3 58.786,206.35 59.55,207.114 59.55,207.118 60.215,207.782 60.857,207.782 C10.2 ; R1.1@60.9,210.4 v2(60.9,208.8) C10.2 ; R1.1 61.541,210.653 63.205,212.318 63.205,212.55 U1.5 ; C11.2 63.813,207.912 60.987,207.912 C10.2 ; C28.2 67.345,190.425 67.995,189.775 U5.8 ; U10.8 80.369,208.625 80.394,208.6 v2(81.497,208.6) C14.1 ; C31.1 91.041,188.8 91.6,189.358 91.6,190.07 91.625,190.095 U7.8 ; C25.2 91.041,181.3 U4.8@92.22,182.478 ; C27.2 91.096,202.9 91.6,203.403 91.6,204.115 91.625,204.14 U8.8 ; C13.1@90.275,210.725 90.946,211.396 91.625,211.396 U9.8@91.65,211.421 ; C23.1@92.7,197 94.33,197 94.425,197.095 U6.8
  Main Power w0.508: v2(60.9,208.8) 66.855,208.8 69.9,205.755 ; v2(67.3,190.4) 69.9,193 69.9,205.755 ; v2(81.497,208.6) 81.497,208.597 78.655,205.755 ; v2(90.3,210.7) 90.3,210.675 89.844,210.219 89.844,209.676 88.968,208.8 88.9,208.8 85.855,205.755 ; v2(90.7,181.2) 90.7,188.675 90.5,188.875 v2(90.5,188.9) 92.7,191.1 v2(92.7,196.9) 92.7,198 91.3,199.4 87.9,199.4 87.055,200.245 87.055,204.555 ; v2(90.7,203) 89.7,204 87.61,204 87.055,204.555 ; 69.9,205.755 78.655,205.755 ; 78.655,205.755 85.855,205.755 ; 85.855,205.755 87.055,204.555
+15V_PROTECTED: C4.1 C5.1 C8.2 C9.2 C18.2 C20.2 U2.5 U3.2 U12.8 | length 53.3
  Top Layer 1 w0.254: C20.2 34.775,186 34.98,185.795 U12.8 ; C9.2@54.936,206.225 C9.2
  Top Layer 1 w0.508: 57.663,205.276 57.79,205.403 57.79,206.054 U3.2
  Top Layer 1 w0.762: C20.2 32.334,186.066 30.634,186.066 30.267,186.433 30.267,191.567 39,200.3 45,200.3 49.135,204.435 49.135,210.78 49.054,210.861 U2.5@48.74,210.861 ; C5.1@49.543,206.312 52.494,206.312 52.706,206.1 C9.2@54.761,206.1 ; C9.2@54.842,206.131 55.03,206.131 55.03,205.831 56.161,204.7 57.2,204.7 57.415,204.915 57.449,204.915 57.736,205.202
GND: C1.1 C2.2 C3.2 C4.2 C5.2 C6.1 C7.1 C8.1 C9.1 C10.1 C11.1 C13.2 C14.2 C18.1 C20.1 C23.2 C25.1 C27.1 C28.1 C29.2 C30.1 C31.2 CN1.2 CN1.5 CR1.2 H1.3 Q1.2 R2.2 R7.1 R8.1 R11.2 R12.2 R40.1 R41.2 U1.2 U2.1 U3.1 U4.4 U5.4 U6.4 U7.4 U8.4 U9.4 U10.4 U12.4 USB2.0 USB2.1 USB2.6 | length 36.1
  Top Layer 1 w0.254: v2(20.8,202.6) CN1.2 v2(21.6,200.9) ; v2(21.5,195.4) CN1.5 v2(22.4,193.9) ; USB2.6 26.5,207.7 v2(27.5,207.7) ; USB2.1 26.5,213.2 v2(27.5,213.2) ; v2(31.6,187.6) C20.1 32.8,188 v2(33.3,188) ; v2(34.3,187.3) 34.875,187.3 C18.1 34.925,187.3 v2(35.5,187.3) ; v2(42.383,209.001) 42.383,208.503 C3.2 ; v2(42.5,190.1) 42.5,189.63 U12.4 ; v2(44,205.3) 44,206.064 C2.2 ; C5.2 47.6,206.159 v2(47.6,205.5) ; v2(53.6,211.9) Q1.2 ; v2(54.268,208.332) 54.329,208.332 54.936,207.725 C9.1 ; v2(56.836,206.9) 56.861,206.875 56.861,206.125 U3.1 ; v2(58.036,215.6) 58.729,215.6 R7.1 58.757,215.614 v2(59.442,215.614) ; R8.1 58.801,210.588 v2(59.302,210.588) ; v2(60.3,206.3) 60.825,206.3 C10.1 ; v2(61.1,216.1) 61.153,216.153 R2.2 61.1,216.654 v2(61.1,217.1) ; v2(63.1,206.3) 63.8,206.3 C11.1 64,206.3 v2(64.7,206.3) ; v2(65.3,188.9) 65.825,188.9 C28.1 65.975,188.9 v2(66.5,188.9) ; v2(69.2,212.8) 70.546,212.8 C1.1 71.882,212.818 v2(71.9,212.8) ; U5.4 71.805,183.652 71.957,183.5 v2(72.3,183.5) ; v2(81.9,210.1) 82.55,210.1 C14.2 82.65,210.1 v2(83.3,210.1) ; v2(87.7,181.3) C25.1 ; v2(87.9,202.9) C27.1 88.5,202.875 v2(88.5,202.3) ; v2(88.372,188.299) 88.375,188.301 C31.2 88.375,189.275 v2(88.4,189.3) ; C25.1 v2(88.4,181.9) ; v2(88.4,209.7) v2(88.4,210.9) ; v2(97.2,215.7) 97.2,215.295 U9.4 ; U8.4 97.3,207.986 v2(97.3,208.4) ; v2(97.3,186.8) 97.3,186.557 97.452,186.405 U4.4@97.664,186.405 ; v2(97.3,194.2) 97.3,194.069 U7.4@97.464,193.905 ; U6.4 100.1,200.941 v2(100.1,201.4)
  Top Layer 1 w0.508: v2(51.132,208.36) 51.149,208.342 52.019,208.342 52.061,208.3 52.097,208.336 53.026,208.336 v2(53.044,208.354)
  other v1: 81.7,172.2 65.8,172.6 57.8,173.2 29.1,174 54.7,174.8 30.2,176.4 26.1,176.5 24.6,177.5 29.2,177.5 64.6,177.6 23.6,178.2 27.6,178.7 51.6,179 34.4,179.1 23.2,179.3 36,179.4 26.8,180.6 23.1,181 98,181.2 39.1,181.3 54.8,181.9 30.1,182 100.1,182 94,182.8 49.5,183 40.8,183.1 26.6,183.2 23,183.6 101.9,183.7 99.2,183.8 40.5,184.5 74.9,184.5 72.2,184.7 26.3,185.1 29.7,185.6 83.3,186.3 44.3,186.4 40.4,186.5 23,186.6 46,186.8 99,187 104.9,187.2 86.313,187.255 26.1,187.3 44.1,187.5 52.8,187.6 39.4,187.7 44.5,188.5 38.5,189.1 81.3,189.1 31.6,189.4 31.4,189.7 47.5,189.7 105.3,189.7 39.8,189.8 86.4,189.8 49.9,190.1 35.6,190.2 79.5,190.3 26.2,190.4 94.3,190.4 23,190.7 42.6,191.1 80.8,191.1 35.5,191.2 33.2,191.6 86.2,191.7 75.7,191.9 33.2,192 104.9,192.3 44.6,192.4 33.4,192.5 81.4,192.5 35.4,192.6 72.7,192.8 26.1,192.9 77.2,193.3 44.9,193.6 74.5,193.6 47.5,193.8 81.1,193.8 37.1,194 49.2,194.3 41.9,194.5 36,194.7 43.4,194.8 30,195 80.9,195.3 26.3,195.4 65.8,195.4 97.3,195.5 82.3,195.8 85.7,195.8 101.3,195.9 44.1,196.1 37.5,196.5 38.5,196.6 39.6,196.7 89,196.9 38.1,197 64.2,197.1 47,197.3 26.5,197.4 59,197.7 76,197.7 81.4,197.9 32.6,198 65.1,198 39.4,198.2 60.2,198.2 32.5,198.8 102.5,199 41.3,199.2 104.4,199.3 55.3,199.4 84.9,199.7 59.4,199.8 66.2,199.8 48.4,200.1 57.9,200.1 61.7,200.1 64.2,200.1 35.2,200.3 46.9,200.3 32.6,200.4 34.8,200.5 97,200.7 81.5,200.8 76.3,200.9 101.7,201.1 52.8,201.3 37.1,201.5 22.4,201.7 42.9,201.8 54.6,202 43.7,202.2 35.1,202.3 26.2,202.6 95.2,202.6 31.9,202.9 64,202.9 98.4,203 54.4,203.1 97,203.1 26.1,203.7 45.9,203.9 31,204.1 23.1,204.2 99,204.4 42.2,204.5 36,204.7 38.2,204.7 28.5,204.9 51.8,204.9 66.1,204.9 36.9,205.3 45.7,205.4 30.9,205.6 98.8,205.9 36.1,206.5 45.5,207.1 31.5,207.2 41.8,207.3 37.2,209.3 54.9,209.5 69.3,209.8 71.6,209.9 57.7,210.2 64.2,211.8 99,211.9 102.6,211.9 94.7,212.1 37.8,212.2 67.7,212.5 98.9,213.1 62,213.2 103.2,213.7 60.1,214 29.9,214.2 70.8,214.4 41.6,214.5 57.3,215.2 74.9,215.5 78.1,215.6 72.8,215.8 103.1,215.8 98.9,215.9 100.3,216 82.9,216.4 83.7,216.5 102.6,216.9 67.2,217 29.1,217.1 54.2,217.5 75.3,217.7 30.3,217.8 34.4,217.9 70.6,218 64.9,218.3 74.5,218.3 83.1,218.4 72.8,218.6 42,218.7 87.2,218.8 79.1,218.9 49.8,219 69.3,219.2 102,219.4 60.8,219.5 89.7,219.5 97.2,219.6
  other v2: 41.771,176.397 43.001,176.405 35.8,176.5 37,176.5 90.9,196.3 90.9,197.5 44.7,206.1 46.9,206.2 55.649,207.786 69.764,208.218 70.964,208.218 46.9,208.4 74.414,210.142 73.2,210.2 58.28,210.515 35.336,213.248 76.1,213.4 65.6,213.5 34.436,214 36.236,214 76.1,214.8 35.336,215 44,215.07 43.016,216.395 51.136,216.4 52.403,216.416 47.3,216.5 39,217 40.4,217 43.018,217.432 47.5,217.5
NetC1_2: C1.2 R1.2 R2.1 U1.3 | length 14.6
  Top Layer 1 w0.254: R1.2 60.9,214.3 62.548,215.948 62.548,216.501 R2.1 63.78,216.6 65.93,214.45 U1.3 68.629,214.45 70.031,215.853 C1.2
NetC2_1: C2.1 C3.1 CR1.1 R5.1 R9.1 U2.4 USB2.2 USB2.5 | length 39.3
  Top Layer 1 w0.254: U2.4@43.94,210.861 U2.4@43.959,210.88 ; v2(51.736,210.1) 51.736,210.83 R5.1
  Top Layer 1 w0.508: USB2.5 26.53,208.9 28.6,208.9 ; USB2.2 31.615,212.02 34.084,209.552 34.1,209.552 ; C2.1 42.832,206.496 42.832,207.059 43.59,207.817 43.59,208.279 43.811,208.5 C3.1 ; C3.1@43.94,208.604 43.836,208.709 43.836,210.818 43.878,210.861 U2.4@43.94,210.861
  Top Layer 1 w1.016: 28.6,208.9 29.252,209.552 34.084,209.552 ; 34.1,209.552 34.948,209.552 38.628,205.872 40.416,205.872 40.644,206.1 C2.1
  Small Signal w0.254: 45.536,210.9 46.336,210.1 v2(51.736,210.1)
  other v1: 38.5,206.2 38.04,207.189 38.5,208
NetC6_2: C6.2 Q1.1 R4.2 R5.2 | length 7.6
  Top Layer 1 w0.254: C6.2 51.811,212.398 R5.2 52.854,212.393 53.311,212.85 Q1.1 54.55,212.85 54.689,212.989 R4.2
NetC7_2: C7.2 U2.2 | length 4.8
  Top Layer 1 w0.254: 39.741,214.875 39.741,214.85 41.19,213.401 U2.2@43.94,213.401
NetC12_1: C12.1 H1.1 | length 3.1
  Top Layer 1 w0.254: C12.1 103.191,197.79 H1.1
NetC12_2: C12.2 R14.2 U6.3 | length 7.6
  Top Layer 1 w0.254: U6.3 100.775,199.635 101.7,198.71 101.7,196.786 102.267,196.219 102.73,196.219 C12.2 102.9,193.952 R14.2
NetC15_2: C15.2 R17.2 U4.3 | length 5.6
  Top Layer 1 w0.254: U4.3@97.664,185.135 100.181,185.135 R17.2 100.419,185.135 C15.2
NetC16_1: C16.1 U12.6 U12.7 | length 12.7
  Top Layer 1 w0.508: C16.1 34.8,180.3 38.6,184.1 38.6,185.965 37.5,187.065 U12.7 U12.6
NetC16_2: C16.2 CN1.4 R40.2 | length 24.4
  Top Layer 1 w0.254: CN1.4@28.5,194.06 28.5,179.4 C16.2
  Small Signal w0.254: C16.2 32.748,175.152 36.301,175.152 R40.2
NetC17_1: C17.1 U12.1 U12.2 | length 8.1
  Top Layer 1 w0.508: U12.2 42.525,183.175 C17.1
NetC17_2: C17.2 CN1.6 R41.1 | length 48.2
  Top Layer 1 w0.254: CN1.6 24.6,200.7 24.6,180.1 30.9,173.8 44.1,173.8 C17.2
  Small Signal w0.254: R41.1 42.499,174.952 45.252,174.952 C17.2
NetC19_1: C19.1 R6.2 R17.1 U6.1 U6.2 | length 54
  Top Layer 1 w0.254: R6.2 85.3,181.7 86.8,180.2 101.2,180.2 104.7,183.7 104.7,185.78 103.78,186.7 102.4,186.7 101.7,187.4 ; U6.2 U6.1 100.2,196.959 C19.1 100.52,194.28 101.52,194.28 101.7,194.1 101.7,187.4 ; R17.1@100.253,186.7 R17.1 101.046,186.746 101.7,187.4
NetC19_2: C19.2 R23.2 U7.3 | length 5
  Top Layer 1 w0.254: U7.3@97.464,192.635 98.175,192.635 98.54,193 C19.2 R23.2
NetC22_1: C22.1 R34.1 R39.2 U6.6 U6.7 | length 45.3
  Top Layer 1 w0.254: U6.7 U6.6 97.235,199.635 97.6,200 97.6,200.8 99.602,202.802 99.602,202.877 100.125,203.4 C22.1 100.52,203.72 101.083,203.72 101.7,204.337 101.7,209.153 100.543,210.311 100.543,210.351 100.241,210.653 R34.1 100.147,210.6 v2(99.1,210.6)
  Small Signal w0.254: v2(75.5,216.6) 75.5,216.675 76.375,217.551 92.149,217.551 v2(99.1,210.6)
NetC22_2: C22.2 R28.2 U8.3 | length 5.1
  Top Layer 1 w0.254: U8.3 97.975,206.68 98.349,207.054 R28.2 C22.2
NetC24_1: C24.1 H1.2 | length 3
  Top Layer 1 w0.254: C24.1 103.019,200.33 H1.2
NetC24_2: C24.2 R30.2 U6.5 | length 10.8
  Top Layer 1 w0.254: U6.5 95.2,200.969 v2(95.2,201.6) ; v2(102,201.9) C24.2@102.899,201.9 ; R30.2 102.9,204.023 C24.2
  Small Signal w0.254: v2@95.201,201.6 95.682,202.081 101.725,202.081 101.906,201.9 v2(102,201.9)
NetC26_1: C26.1 R34.2 U9.3 | length 5.1
  Top Layer 1 w0.254: U9.3 97.975,213.961 98.214,214.2 C26.1 R34.2
NetQ1_4: Q1.4 R8.2 USB2.4 | length 38.4
  Top Layer 1 w0.254: USB2.4 v2(27.5,210) ; Q1.4 56.724,211.089 57.231,211.089 57.542,211.4 v2(57.636,211.4) 57.702,211.466 57.702,211.642 58.108,212.048 58.637,212.048 R8.2
  Small Signal w0.254: v2(27.5,210) 36.739,210 40.039,213.3 43.8,213.3 45.8,215.3 49.309,215.3 54.027,210.582 56.818,210.582 v2(57.636,211.4)
NetQ1_5: Q1.5 R7.2 USB2.3 | length 38.2
  Top Layer 1 w0.254: USB2.3 v2(27.5,211) ; Q1.5 56.724,212.039 57.115,212.039 57.754,212.678 57.754,213.159 58.695,214.1 R7.2 v2(57.836,214.1)
  Small Signal w0.254: v2(27.5,211) 34.434,211 39.134,215.7 50.486,215.7 52.086,214.1 v2(57.836,214.1)
NetQ1_6: Q1.6 R4.1 | length 2.4
  Top Layer 1 w0.254: R4.1 56.182,212.989 56.321,212.85 Q1.6
NetR3_2: R3.2 U1.1 U1.4 | length 8.5
  Top Layer 1 w0.254: U1.4 63.67,214.45 63.797,214.323 63.797,214.091 65.338,212.55 U1.1 66.162,208.743 66.859,208.047 R3.2@66.9,208.047
NetR6_1: R6.1 R15.1 U5.2 | length 4.3
  Top Layer 1 w0.254: U5.2 69.265,181.818 R15.1 R6.1
NetR9_2: R9.2 R10.1 U2.3 | length 7.9
  Top Layer 1 w0.254: R9.2 R10.1 41.361,210.352 43.14,212.131 U2.3@43.94,212.131
NetR10_2: R10.2 R11.1 U2.8 | length 13.4
  Top Layer 1 w0.254: R10.2 39.791,211.9 v2@41.136,211.9 ; R11.1 44.582,216.859 46.836,214.606 v2(46.836,214.6) 46.871,214.635 48.704,214.635 U2.8@48.74,214.671
  Small Signal w0.254: v2@41.136,211.9 44.136,211.9 v2(46.836,214.6)
  other v2: 41.336,211.9
NetR12_1: R12.1 U2.7 | length 5.1
  Top Layer 1 w0.254: U2.7@48.74,213.401 49.54,213.401 50.221,214.082 50.221,215.72 49.082,216.859 R12.1
NetR13_1: R13.1 R19.2 R22.2 R24.2 U5.6 | length 25.2
  Top Layer 1 w0.254: R22.2@63.234,191.6 69.5,191.6 v2(70.5,190.6) 70.517,190.582 70.517,189.081 U5.6 U5.6@70.535,188.353 ; R13.1 69.329,187.146 U5.6@70.535,188.353 ; R19.2 71.941,186.946 U5.6@70.535,188.353 ; v2(75.8,190.5) 76.772,190.5 R24.2
  Small Signal w0.254: v2(70.5,190.6) 70.55,190.55 75.75,190.55 v2(75.8,190.5)
NetR13_2: R13.2 R15.2 U5.1 | length 5.3
  Top Layer 1 w0.254: R13.2 65.941,185.653 66.83,184.764 66.83,184.723 67.417,184.136 U5.1 67.995,182.57 67.752,182.328 67.752,181.799 R15.2
NetR16_1: R16.1 R25.3 U4.7 | length 25.1
  Top Layer 1 w0.254: R25.3 83.814,196.55 84.334,196.03 84.334,190.534 v2(84.3,190.5) ; R16.1 91.16,183.4 91.625,183.865 U4.7 92.369,183.832 93.768,183.832 v2(93.8,183.8)
  Small Signal w0.254: v2(84.3,190.5) 84.3,187.2 87.2,184.3 93.3,184.3 v2(93.8,183.8)
NetR16_2: R16.2 R18.1 U4.6 | length 5.5
  Top Layer 1 w0.254: R16.2 88.478,183.499 88.478,184.028 88.85,184.4 89.401,184.4 89.773,184.772 89.773,185.301 R18.1 91.36,185.4 91.625,185.135 U4.6
NetR18_2: R18.2 R25.1 U4.1 U4.2 | length 36.9
  Top Layer 1 w0.254: R25.1@73.8,197.022 73.8,190.9 79.3,185.4 86.2,185.4 R18.2 88.478,185.499 88.478,186.078 90,187.6 93.6,187.6 94.8,186.4 94.8,185.4 96.335,183.865 U4.2 97.664,183.865 U4.1@97.664,182.595
NetR19_1: R19.1 U5.7 U11.5 | length 34.8
  Top Layer 1 w0.254: v2(68.823,187.997) 68.909,187.997 69.265,188.353 U5.7 ; R19.1 73.747,185.5 v2(74.7,185.5)
  Small Signal w0.254: U11.5 53.9,197.8 53.9,193.3 59.203,187.997 v2(68.823,187.997) 71.32,185.5 v2(74.7,185.5)
NetR20_1: R20.1 R26.3 U7.7 | length 32.6
  Top Layer 1 w0.254: R20.1@90.047,190.7 91.16,190.7 U7.7@91.825,191.365 ; U7.7@92.354,191.383 93.682,191.383 v2(93.7,191.4)
  Small Signal w0.254: R26.3 69.436,194.4 90.7,194.4 v2(93.7,191.4)
NetR20_2: R20.2 R21.1 U7.6 | length 5.6
  Top Layer 1 w0.254: R20.2 88.427,190.799 88.427,191.328 88.849,191.75 89.425,191.75 89.848,192.172 89.848,192.701 89.947,192.8 90.112,192.635 U7.6
NetR21_2: R21.2 R26.1 U7.1 U7.2 | length 50.7
  Top Layer 1 w0.254: R26.1@56.675,196.883 58.692,198.9 85.2,198.9 86.54,197.56 88.328,195.772 R21.2 88.552,193.025 88.552,193.428 90.225,195.1 93.9,195.1 94.9,194.1 94.9,192.7 96.235,191.365 97.464,191.365 U7.1@97.464,190.095
NetR22_1: R22.1 R26.2 | length 5.3
  Top Layer 1 w0.254: R22.1@61.814,191.7 R26.2
NetR24_1: R24.1 R25.2 | length 6.7
  Top Layer 1 w0.254: R24.1 78.3,190.576 78.602,190.878 78.643,190.878 78.814,191.049 R25.2
NetR25_4: R25.4 R35.2 U9.1 U9.2 | length 37.6
  Top Layer 1 w0.254: v2(85.8,208) 85.8,211.806 88.353,214.359 R35.2 88.452,214.499 88.452,215.028 89.925,216.5 93.9,216.5 94.7,215.7 94.7,213.5 95.509,212.691 U9.2 U9.1
  Small Signal w0.254: R25.4 75.692,203.9 84.1,203.9 85.8,205.6 v2(85.8,208)
NetR25_5: R25.5 R27.1 | length 3.8
  Top Layer 1 w0.254: R25.5 78.814,202.494 79.447,203.127 R27.1
NetR25_6: R25.6 R36.1 U9.7 | length 24.4
  Top Layer 1 w0.254: R36.1 91.234,212.3 91.625,212.691 U9.7 92.34,212.696 93.796,212.696 v2(93.8,212.7)
  Small Signal w0.254: R25.6 84.011,202.022 84.889,201.144 91.056,201.144 92.428,202.516 92.428,211.328 v2(93.8,212.7)
NetR26_4: R26.4 R31.2 U8.1 U8.2 | length 48.1
  Top Layer 1 w0.254: v2(83.6,206.7) 88.107,206.7 88.406,206.999 88.406,207.806 89.8,209.2 93.9,209.2 94.8,208.3 94.8,206.5 95.89,205.41 U8.2 U8.1
  Small Signal w0.254: R26.4@57.1,201.6 57.1,202.308 59.065,204.273 70.273,204.273 72.7,206.7 v2(83.6,206.7)
NetR26_5: R26.5 R29.1 | length 13.5
  Top Layer 1 w0.254: R26.5 63.792,204 70.6,204 72.3,205.7 R29.1
NetR26_6: R26.6 R32.1 U8.7 | length 29
  Top Layer 1 w0.254: R26.6 68.936,199.9 83.9,199.9 88.019,204.019 89.295,204.019 89.748,204.472 89.748,205.001 R32.1 91.315,205.1 91.625,205.41 U8.7
NetR27_2: R27.2 R29.2 R33.2 R38.1 U10.6 | length 17.3
  Top Layer 1 w0.254: R33.2 74.205,212.971 75.958,211.218 76.44,211.218 77.829,209.829 80.674,212.674 81.375,212.674 81.555,212.853 R38.1 ; R29.2 77.853,205.7 R27.2 77.829,205.725 U10.6
NetR31_1: R31.1 R32.2 U8.6 | length 5.3
  Top Layer 1 w0.254: R32.2@88.452,205.199 88.452,205.728 88.725,206 89.429,206 89.701,206.272 89.701,206.801 R31.1 90.02,206.68 U8.6
NetR33_1: R33.1 U10.7 U11.6 | length 38.9
  Top Layer 1 w0.254: v2(73.1,214.4) 74.1,214.4 R33.1@74.117,214.418 ; U10.7 79.099,209.829 79.498,210.228 79.498,210.351 v2(79.564,210.418)
  Small Signal w0.254: U11.6 53.5,205 60.696,205 66.896,211.2 75,211.2 ; v2(73.1,214.4) 73.1,213.1 75,211.2 ; v2(79.564,210.418) 78.782,211.2 75,211.2
NetR35_1: R35.1 R36.2 U9.6 | length 5.6
  Top Layer 1 w0.254: R36.2 88.452,212.399 88.452,212.928 88.875,213.35 89.325,213.35 89.748,213.772 89.748,214.301 R35.1 ; R35.1@89.847,214.359 90.244,213.961 U9.6
NetR37_1: R37.1 R39.1 U10.2 | length 5.8
  Top Layer 1 w0.254: R39.1 80.107,216.7 R37.1 80.207,215.749 79.367,214.909 79.251,214.909 79.099,214.756 U10.2
NetR37_2: R37.2 R38.2 U10.1 | length 4.9
  Top Layer 1 w0.254: U10.1 81.288,214.045 81.49,214.248 82.501,214.248 82.501,214.404 81.7,215.206 R37.2
NetU11_1: U11.1 U12.3 | length 10.3
  Top Layer 1 w0.508: U12.3 42.95,188.335 47.215,192.6 U11.1
NetU11_4: U11.4 U12.5 | length 19.1
  Top Layer 1 w0.508: U12.5 37.075,191.875 43.8,198.6 U11.4
Vref: C15.1 C26.2 C29.1 C30.2 R3.1 R14.1 R23.1 R28.1 R30.1 U4.5 U5.3 U5.5 U7.5 U8.5 U9.5 U10.3 U10.5 | length 139.4
  Top Layer 1 w0.254: R14.1 103.1,192.248 v2(103.1,190.2) 103.1,188.42 C15.1
  Top Layer 1 w0.508: R3.1 67.055,206.553 70.3,206.553 C30.2 71.689,206.618 73.764,208.693 C29.1 v2(75.149,208.718) 76.533,208.718 76.559,208.743 U10.5@76.559,208.87
  Main Power w0.508: v2(70.5,183.1) 70.5,181.445 71.223,180.722 83.578,180.722 ; v2(72.2,189.8) 72.1,189.9 74.4,189.9 83.578,180.722 ; v2(75.149,208.718) 77.716,211.284 ; v2(77.8,212.9) 77.9,213 77.9,211.469 77.716,211.284 ; v2(93.3,208) 94.9,209.6 95.1,209.6 ; v2(93.5,186.4) 94.69,187.59 ; v2(93.6,194) 93.6,195.123 94.69,196.212 94.69,197.31 93.6,198.4 93.6,204.1 95.1,205.6 95.1,209.6 ; 95.1,213.4 v2(93.3,215.2) 92.3,216.2 ; v2(99.6,217.2) 93.3,217.2 92.3,216.2 ; v2(102.8,206) 100.05,208.75 99.35,208.75 98.5,209.6 95.1,209.6 ; v2(103.1,190.2) 102.2,189.3 v2(100.8,189.3) 95.09,189.3 94.69,188.9 94.69,187.59 ; 77.716,211.284 83.184,211.284 88.1,216.2 92.3,216.2 ; 83.578,180.722 85.5,178.8 92.4,178.8 94.69,181.09 94.69,187.59
  other v2: 99.6,208.5
pads on no net: CN1.3 H1.4 Q1.3 U2.6 U3.4 U3.5 U11.2 U11.3 U11.7 U11.8

## Polygon pours and split planes (outlines as drawn)
NetC2_1 on Small Signal "NETC2_1_L04_P004" (solid, remove dead copper, pour order 4): 45.3,211.7 44.6,211 39,211 38,210 38,206 38.7,205.3 40.4,205.3 41.1,206 41.1,208.8 42.05,209.75 45.65,209.75 46.3,210.4 46.3,211.2 45.8,211.7
NetC2_1 on Small Signal "NETC2_1_L04_P001" (solid, pour order 1): 50.8,211.7 52.4,210.1 52.4,209.7 52.1,209.4 45.4,209.4 44.7,210.1 44.7,211.1 45.3,211.7
NetC2_1 on Top Layer 1 "NETC2_1_L01_P005" (solid, remove dead copper, pour order 5): 36.2,208.7 38.6,208.7 39,208.3 39,206 38.7,205.7
GND on Main Power "GND_L03_P008" (solid, pour order 8): 19.5,170.97 19.5,219.43 cw(c20.77,219.43) 20.77,220.7 107.23,220.7 cw(c107.23,219.43) 108.5,219.43 108.5,170.97 cw(c107.23,170.97) 107.23,169.7 20.77,169.7 cw(c20.77,170.97)
Vref on Main Power "VREF_L03_P007" (solid, remove dead copper, pour order 7): 71.2,190.4 71.2,188.8 72,188 74.6,188 77.7,184.9 77.7,183.2 76.9,182.4 72.4,182.4 71.1,183.7 69.8,183.7 69.4,183.3 69.4,181.3 71.4,179.3 82.2,179.3 84.8,176.7 93.1,176.7 96.4,180 96.4,187.3 97.1,188 102.7,188 104.2,189.5 104.2,191 103.5,191.7 101.2,191.7 100.6,191.1 96.9,191.1 96.2,191.8 96.2,208 96.9,208.7 98.3,208.7 101.6,205.4 103.7,205.4 104.3,206 104.3,207.7 102,210 98.4,210 96.2,212.2 96.2,215.3 97.3,216.4 99.6,216.4 100.8,217.6 100.8,218.2 100.3,218.7 93,218.7 92.6,218.3 87.7,218.3 82.2,212.8 79.7,212.8 78.8,213.7 77.3,213.7 74.8,211.2 74.8,208 75.2,207.6 76.6,207.6 79.2,210.2 85.1,210.2 88.8,213.9 92.2,213.9 93,213.1 93,181 92,180 88,180 76.9,191.1 71.9,191.1
+12V on Main Power "+12V_L03_P006" (solid, remove dead copper, pour order 6): 60.4,209.8 60.4,208 61.2,207.2 65.6,207.2 69,203.8 69,194.3 66.2,191.5 66.2,189.9 66.5,189.6 67.9,189.6 71.3,193 71.3,202.7 73.2,204.6 85.1,204.6 85.7,204 85.7,199.9 87.5,198.1 91.4,198.1 91.9,197.6 91.9,191.8 89.6,189.5 89.6,180.9 90.2,180.3 91.5,180.3 92.4,181.2 92.4,188.6 93,189.2 93,199.9 91.9,201 88.7,201 87.5,202.2 87.5,203.2 87.9,203.6 88.6,203.6 89.9,202.3 91.1,202.3 92,203.2 92,210 90.8,211.2 90.1,211.2 87.7,208.8 80.7,208.8 78.6,206.7 70.4,206.7 70.4,207.1 67.1,210.4 61,210.4
GND on GND "GND_L02_P003" (solid, pour order 3): 19.5,170.97 19.5,219.43 cw(c20.77,219.43) 20.77,220.7 107.23,220.7 cw(c107.23,219.43) 108.5,219.43 108.5,170.97 cw(c107.23,170.97) 107.23,169.7 20.77,169.7 cw(c20.77,170.97)

## Other copper
Top Layer 1:
  region: 101.527,176.295 101.549,176.295 101.549,176.273 101.505,176.273 101.505,176.295
  region: 101.593,175.237 101.615,175.237 101.615,175.215 101.593,175.215
  region: 99.522,174.951 99.5,174.951 99.5,174.973 99.522,174.973
  region: 101.659,176.185 101.637,176.185 101.637,176.207 101.659,176.207
  region: 101.461,176.317 101.505,176.317 101.505,176.295 101.461,176.295
  region: 97.407,177.661 97.407,177.683 97.429,177.683 97.429,177.639 97.407,177.639
  region: 101.02,176.427 100.954,176.427 100.954,176.449 101.086,176.449 101.086,176.427 101.042,176.427
  region: 101.747,176.075 101.747,176.052 101.725,176.052 101.725,176.097 101.747,176.097
  region: 101.703,176.119 101.725,176.119 101.725,176.097 101.703,176.097
  region: 101.174,176.427 101.196,176.427 101.196,176.405 101.086,176.405 101.086,176.427 101.152,176.427
  region: 100.381,176.625 100.381,176.603 100.337,176.603 100.337,176.625 100.359,176.625
  region: 101.637,176.207 101.615,176.207 101.615,176.229 101.637,176.229
  region: 101.747,176.03 101.769,176.03 101.769,176.008 101.747,176.008
  region: 100.844,176.471 100.932,176.471 100.932,176.449 100.822,176.449 100.822,176.471
  region: 101.615,176.251 101.615,176.229 101.571,176.229 101.571,176.251 101.593,176.251
  region: 101.549,176.273 101.571,176.273 101.571,176.251 101.549,176.251
  region: 101.218,176.405 101.284,176.405 101.284,176.383 101.218,176.383
  region: 100.601,176.515 100.579,176.515 100.579,176.537 100.624,176.537 100.624,176.515
  region: 100.8,176.471 100.712,176.471 100.712,176.493 100.8,176.493
  region: 101.439,176.339 101.461,176.339 101.461,176.317 101.417,176.317 101.417,176.339
  region: 101.35,176.383 101.35,176.361 101.306,176.361 101.306,176.383 101.328,176.383
  region: 100.513,176.537 100.513,176.559 100.535,176.559 100.535,176.537
  region: 99.522,175.039 99.544,175.039 99.544,174.995 99.522,174.995 99.522,175.017
  region: 100.447,176.559 100.447,176.581 100.469,176.581 100.469,176.559
  region: 101.417,176.339 101.373,176.339 101.373,176.361 101.417,176.361
  region: 101.659,176.163 101.659,176.185 101.681,176.185 101.681,176.163 101.703,176.163 101.703,176.141 101.681,176.141 101.681,176.163
  region: 100.69,176.515 100.712,176.515 100.712,176.493 100.646,176.493 100.646,176.515 100.668,176.515
  region: 100.403,176.581 100.381,176.581 100.381,176.603 100.425,176.603 100.425,176.581

## Silkscreen, mask and mechanical layers (free items; w line width, h text height)
Top Overlay:
  region: 1879 vertices and 2 holes, not listed, extent 95.931,170.942 101.989,179.291
  text "RIGHT" at 104.6,201.3 h0.6
  text "LEFT" at 104.9,196 h0.6
Mechanical 2:
  lines w0.254: 19.5,170.97 ccw(c20.77,170.97) 20.77,169.7 107.23,169.7 ccw(c107.23,170.97) 108.5,170.97 108.5,202.4 108.5,219.43 ccw(c107.23,219.43) 107.23,220.7 20.77,220.7 ccw(c20.77,219.43) 19.5,219.43 19.5,170.97